# Altium PCB NewTrackerBoard.PcbDoc (part 3 of 4)
Units mm, origin at the board's own origin, x right, y up, seen from the top; angles counter-clockwise.
Board outline 47 x 47 mm, 4 copper layers (L1 (SIG), L2 (GND), L3 (GND), L4 (SIG + PWR)), stack 1.566 mm thick; 77 components, 57 nets, 308 pads, 297 vias.
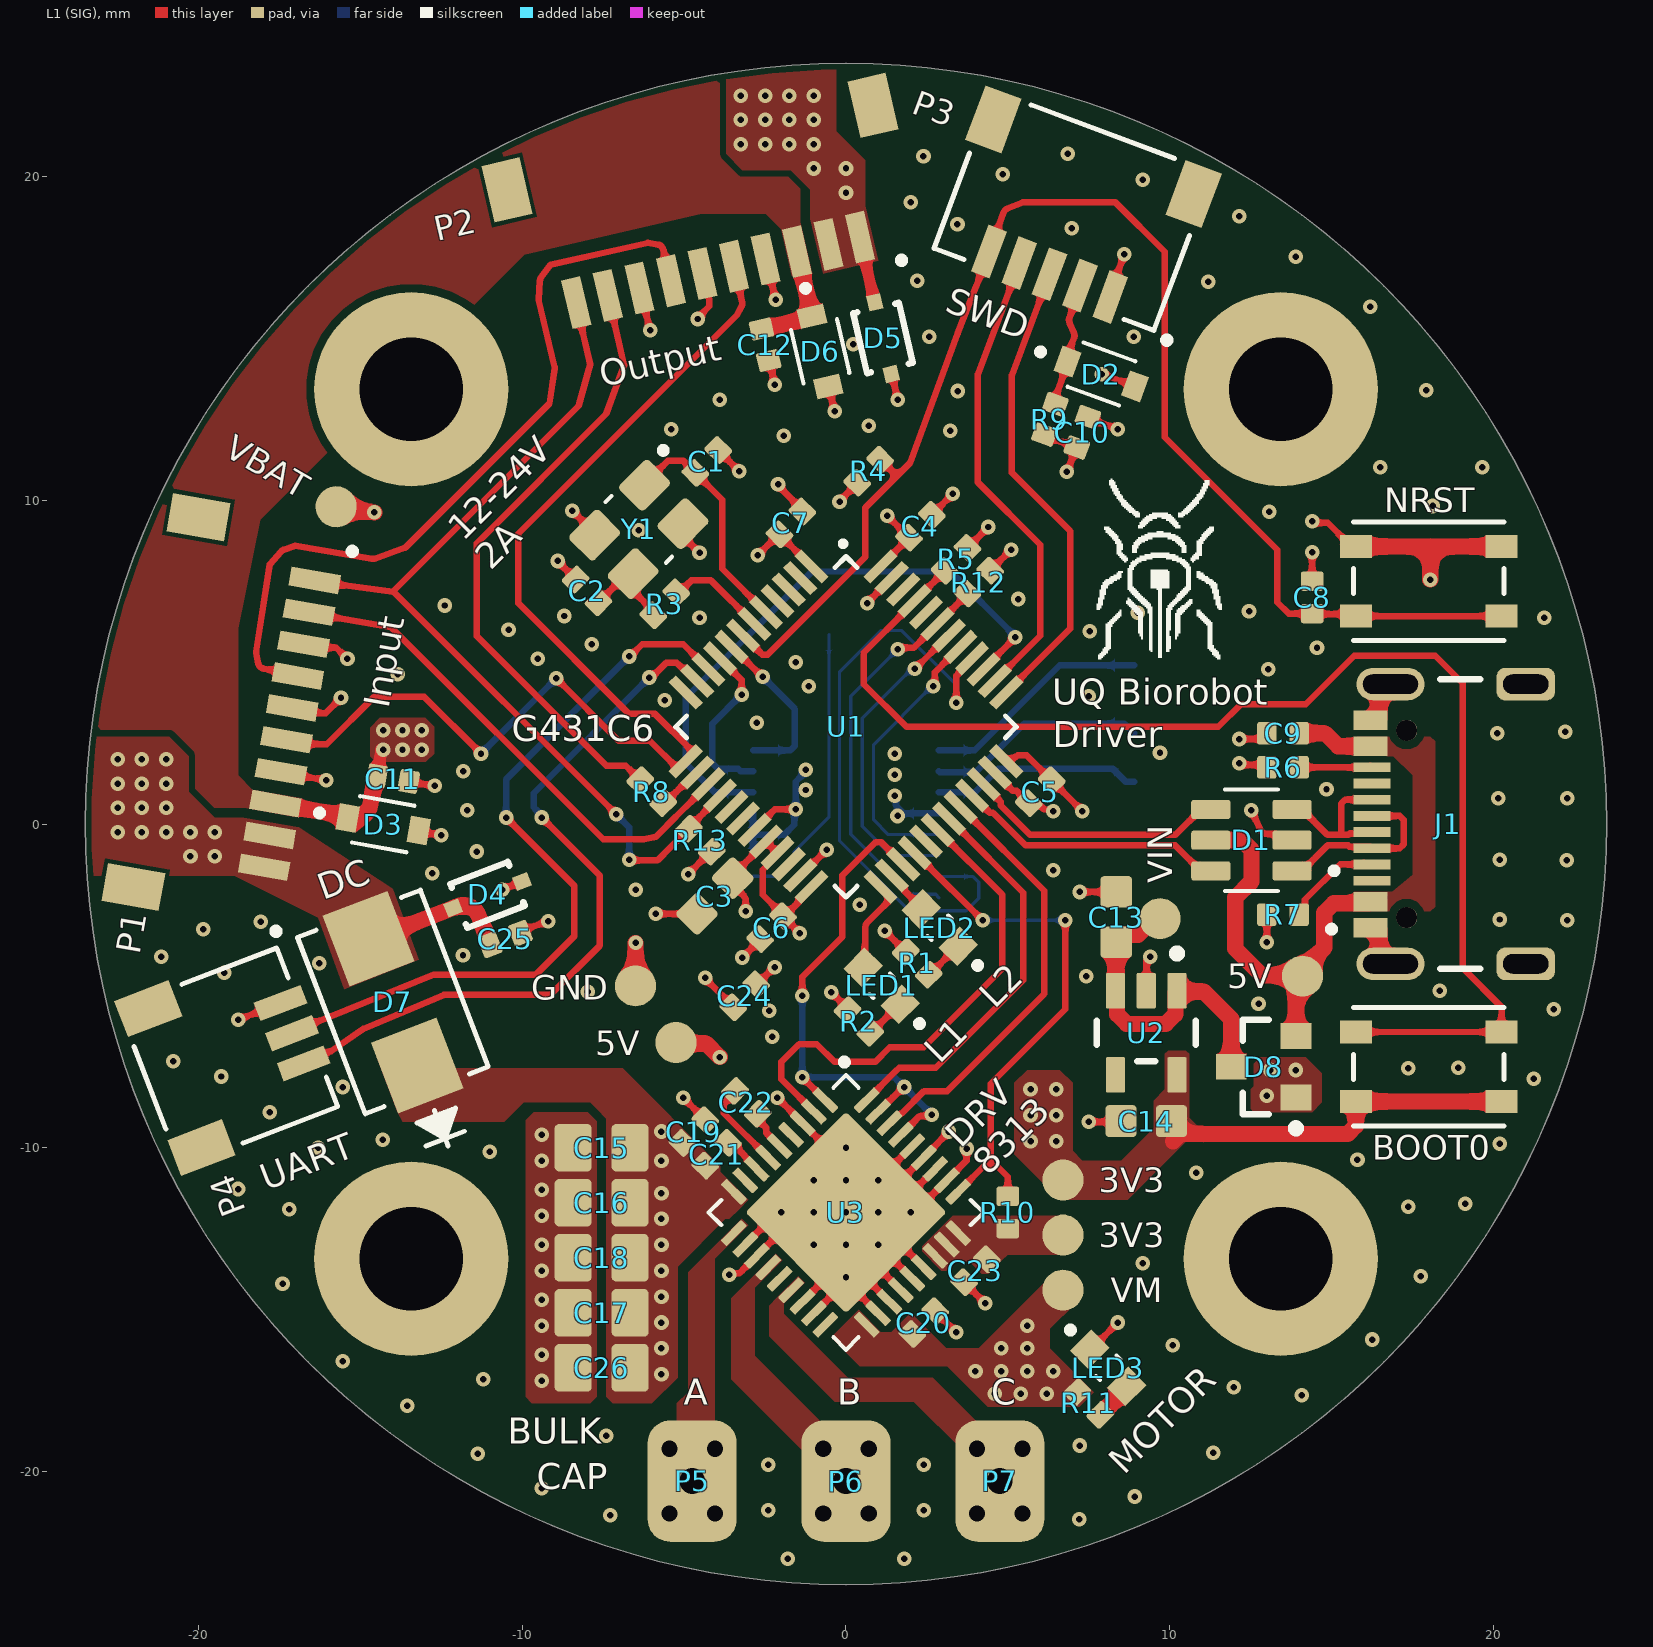
[diagram p0: L1 (SIG) view]

## Via types
v1: diameter 0.45, hole 0.2, L1 (SIG) to L4 (SIG + PWR), tented both sides, 297 vias

## Nets (pads, with @x,y where several pads share a name; then routed paths per layer and width w, separated by ;. In a path a pad name is that pad's centre, name@x,y a point inside that pad or via, vN(x,y) a via of type N, cw(c..) or ccw(c..) an arc to the next point about the centre after c; other vN are vias at no path point) (continued)
+3V3: (continued)
  L1 (SIG) w0.2: v1(-4.875,-1.55) R13.1@-4.339,-1.014 ; v1(-4.35,-4.75) -4.35,-4.773 -3.484,-5.639 C24.1@-3.484,-5.662 ; R13.1@-4.146,-0.854 R13.1@-4.129,-0.854 ; C3.2@-3.498,-1.673 -3.339,-2.036 -3.159,-2.217 cw(c-3.3,-2.358) -3.1,-2.358 v1(-3.1,-2.7) ; C3.2@-3.295,-1.386 -2.811,-0.902 U1.20@-2.475,-0.536 -2.438,-0.573 -2.158,-0.852 U1.21@-2.121,-0.889 -2.121,-0.963 -2.575,-1.417 -2.575,-2.187 -1.946,-2.816 C6.2@-1.946,-2.846 ; v1(-2.725,8.3) -2.207,8.818 C7.2@-2.054,8.946 -1.878,8.768 -1.411,8.302 U1.1@-1.061,7.95 ; v1(-1.425,-3.375) -1.946,-2.853 C6.2@-1.946,-2.846 ; U1.24@-1.061,-1.95 -1.382,-2.332 -1.78,-2.73 -1.792,-2.737 C6.2@-1.946,-2.846 ; v1(-0.2,9.95) -0.2,9.975 0.346,10.521 R4.2@0.346,10.546 ; U1.48@1.061,7.95 1.061,7.955 1.946,8.841 C4.2@1.946,8.846 1.946,8.85 1.275,9.521 v1(1.275,9.525) ; R12.1@4.454,7.829 v1(5.1,8.475) ; U1.36@4.95,1.939 5.007,1.956 5.03,1.979 5.311,2.12 5.58,2.12 5.639,2.061 6.347,1.353 6.35,1.35 6.527,1.173 v1(7.3,0.4) ; R9.1@6.1,12 6.117,11.994 6.353,11.916 6.895,11.718 7.015,11.692 C10.2@7.129,11.63 ; v1(6.825,10.875) cw(c7.024,10.859) 6.881,10.999 7.055,11.476 C10.2@7.1,11.6
  L1 (SIG) w0.5: 10.1,-9.8 10.325,-9.575 15.5,-9.575 15.75,-9.325 BOOT0.3@15.75,-8.575 BOOT0.4@20.25,-8.575
  other v1: 5.7,-9.8 6.5,-9.8 5.7,-9 6.5,-9 5.7,-8.2 6.5,-8.2
+5V: 5V.1@-5.25,-6.75 C11.2 C12.1 D3.K D6.K D8.1 P1.8 P2.3 | length 10.1
  L1 (SIG) w0.2: P2.3@-1.512,17.68 -1.5,17.668 P2.3@-1.5,17.632
  L1 (SIG) w0.35: C11.2@-14.492,1.487 -14.462,1.659 -14.359,2.242 -14.305,2.296 v1(-14.3,2.3)
  L1 (SIG) w0.45: v1@-14.322,2.285 v1(-14.3,2.3)
  L1 (SIG) w0.5: P1.8@-17.628,0.631 -17.111,0.54 D3.K@-15.597,0.273 ; D3.K@-15.361,0.339 -15.39,0.191 D3.K@-15.391,0.186 -15.33,0.175 -15.282,0.167 -15.28,0.167 ccw(c-15.195,0.659) -14.705,0.558 -14.665,0.753 -14.524,1.352 -14.517,1.39 C11.2@-14.492,1.487 ; 5V.1@-5.25,-6.75 -5.221,-6.779 -4.321,-6.779 v1(-3.9,-7.2) ; C12.1@-2.612,15.287 -2.515,15.31 -1.203,15.613 D6.K@-1.11,15.69 ; P2.3@-1.5,17.632 -1.493,17.602 -1.393,17.169 -1.064,15.745 -1.061,15.732 -1.056,15.71 D6.K@-1.05,15.684
  other v1: 13,-8.4 13.1,-7.6 13.9,-7.6 -13.7,2.3 -13.1,2.3 -14.3,2.9 -13.7,2.9 -13.1,2.9
+D3V3: 3V3.1@6.7,-12.7 C23.2 R10.2 U3.25 U3.26 U3.27
+USB5V: 5V.1@14.1,-4.7 C9.2 D1.5 D8.2 J1.A4_B9 J1.B4_A9 | length 15.2
  L1 (SIG) w0.2: J1.A4_B9@16.195,-2.4 J1.A4_B9@16.62,-2.275
  L1 (SIG) w0.5: D1.5@11.27,-0.5 12.232,-0.5 12.525,-0.793 12.525,-1.775 12.025,-2.275 12.025,-3.85 12.846,-4.671 14.071,-4.671 5V.1@14.1,-4.7 ; D8.2@13.9,-6.55 13.9,-5.108 5V.1@14.1,-4.908 ; C9.2@14,2.8 14.8,2.8 15.2,2.4 J1.B4_A9@16.195,2.4 ; 5V.1@14.1,-4.492 14.775,-3.817 14.775,-2.743 15.068,-2.45 16.145,-2.45 J1.A4_B9@16.195,-2.4 ; J1.B4_A9@16.245,2.4 J1.B4_A9@16.291,2.4
+VBAT: C25.2 D4.2 D5.2 D7.A P1.9 P1.10 P2.1 P2.2 VBAT.1 | length 7.3
  L1 (SIG) w0.2: VBAT.1@-15.8,9.8 VBAT.1@-15.75,9.8 ccw(c-15.671,9.984) VBAT.1@-15.698,9.785
  L1 (SIG) w0.35: P2.1@0.427,18.115 0.559,17.543 0.871,16.19 D5.2@0.887,16.122
  L1 (SIG) w0.5: VBAT.1@-15.697,9.785 v1(-14.575,9.625) ; D7.A@-14.1,-3.3 -13.957,-3.298 D4.2@-12.136,-2.598 D4.2@-12.025,-2.548 ; D4.2@-12.024,-2.547 cw(c-11.817,-3.003) -11.351,-2.824 -11.037,-3.64 C25.2@-11,-3.7
  other v1: -20.25,-1 -19.5,-1 -22.5,-0.25 -21.75,-0.25 -21,-0.25 -20.25,-0.25 -19.5,-0.25 -22.5,0.5 -21.75,0.5 -21,0.5 -22.5,1.25 -21.75,1.25 -21,1.25 -22.5,2 -21.75,2 -21,2 0,19.5 -1,20.25 0,20.25 -3.25,21 -2.5,21 -1.75,21 -1,21 -3.25,21.75 -2.5,21.75 -1.75,21.75 -1,21.75 -3.25,22.5 -2.5,22.5 -1.75,22.5 -1,22.5
+VIN: C13.2 D8.3 U2.1 U2.3 VIN.1 | length 10.2
  L1 (SIG) w0.5: VIN.1@9.7,-2.925 9.516,-2.925 9.022,-3.419 8.586,-3.419 8.338,-3.668 8.338,-5.137 U2.3@8.325,-5.15 8.375,-5.2 8.375,-5.882 8.668,-6.175 9.875,-6.175 10.175,-5.875 10.175,-5.2 U2.1@10.225,-5.15 10.425,-5.15 10.45,-5.175 11.05,-5.175 11.9,-6.025 D8.3@11.9,-7.5
+VM: C15.2 C16.2 C17.2 C18.2 C19.2 C20.2 C21.2 C26.2 D7.C R11.2 U3.9 U3.19 VM.1
  other v1: 4.6,-17.6 5.4,-17.6 6.2,-17.6 -5.7,-17 4,-16.9 4.8,-16.9 5.6,-16.9 6.4,-16.9 -5.7,-16.2 4.8,-16.2 5.6,-16.2 5.6,-15.5 -5.7,-15.4 -5.7,-14.6 -5.7,-13.8 -5.7,-13 -5.7,-12.2 -5.7,-11.4 -5.7,-10.4 -5.7,-9.5
BOOT0: BOOT0.1 BOOT0.2 R5.2 U1.45 | length 40.6
  L1 (SIG) w0.2: R5.2@3.046,7.814 U1.45@2.121,6.889 2.089,6.889 1.9,6.7 1.9,6.642 0.55,5.292 0.55,4.319 1.869,3 11.5,3 12.2,3.7 14.2,3.7 15.7,5.2 18.2,5.2 19.05,4.35 19.05,-4.45 20.25,-5.65 BOOT0.2@20.25,-6.425 BOOT0.1@15.75,-6.425
CPH: C22.2 U3.6 | length 2.8
  L1 (SIG) w0.2: C22.2@-3.429,-8.246 -3.429,-8.304 -3.775,-8.65 -3.775,-8.932 U3.6@-2.404,-10.303
CPL: C22.1 U3.5 | length 1.3
  L1 (SIG) w0.2: C22.1@-2.721,-8.954 -2.721,-9.128 -2.467,-9.382 -2.467,-9.532 U3.5@-2.051,-9.949
DRV_EN: U1.27 U3.1 U3.33 U3.35 | length 17.2
  L1 (SIG) w0.2: v1(-1.35,-7.825) v1(-1.35,-7.825) U3.1@-0.636,-8.535 U3.1@-0.636,-8.535 ; v1(-1.35,-5.3) -1.35,-4.725 -0.111,-3.486 -0.111,-1.586 0.917,-0.558 1.083,-0.558 U1.27@1.768,-1.243 ; U3.35@0.99,-8.889 1.013,-8.889 1.777,-8.125 v1(1.8,-8.125) ; U3.33@1.697,-9.596 1.701,-9.596 2.274,-9.023 2.602,-9.023 v1(2.65,-8.975)
  L4 (SIG + PWR) w0.2: v1(-1.35,-5.3) v1(-1.35,-7.825) 1.5,-7.825 v1(2.65,-8.975)